# Altium PCB FMM-v1.0.PcbDoc (part 5 of 5)
Units mm, origin at the board's own origin, x right, y up, seen from the top; angles counter-clockwise.
Board outline 115 x 96 mm, 4 copper layers (Top Layer, Power Layer, Ground Layer, Bottom Layer), stack 1.57 mm thick; 218 components, 129 nets, 744 pads, 321 vias.
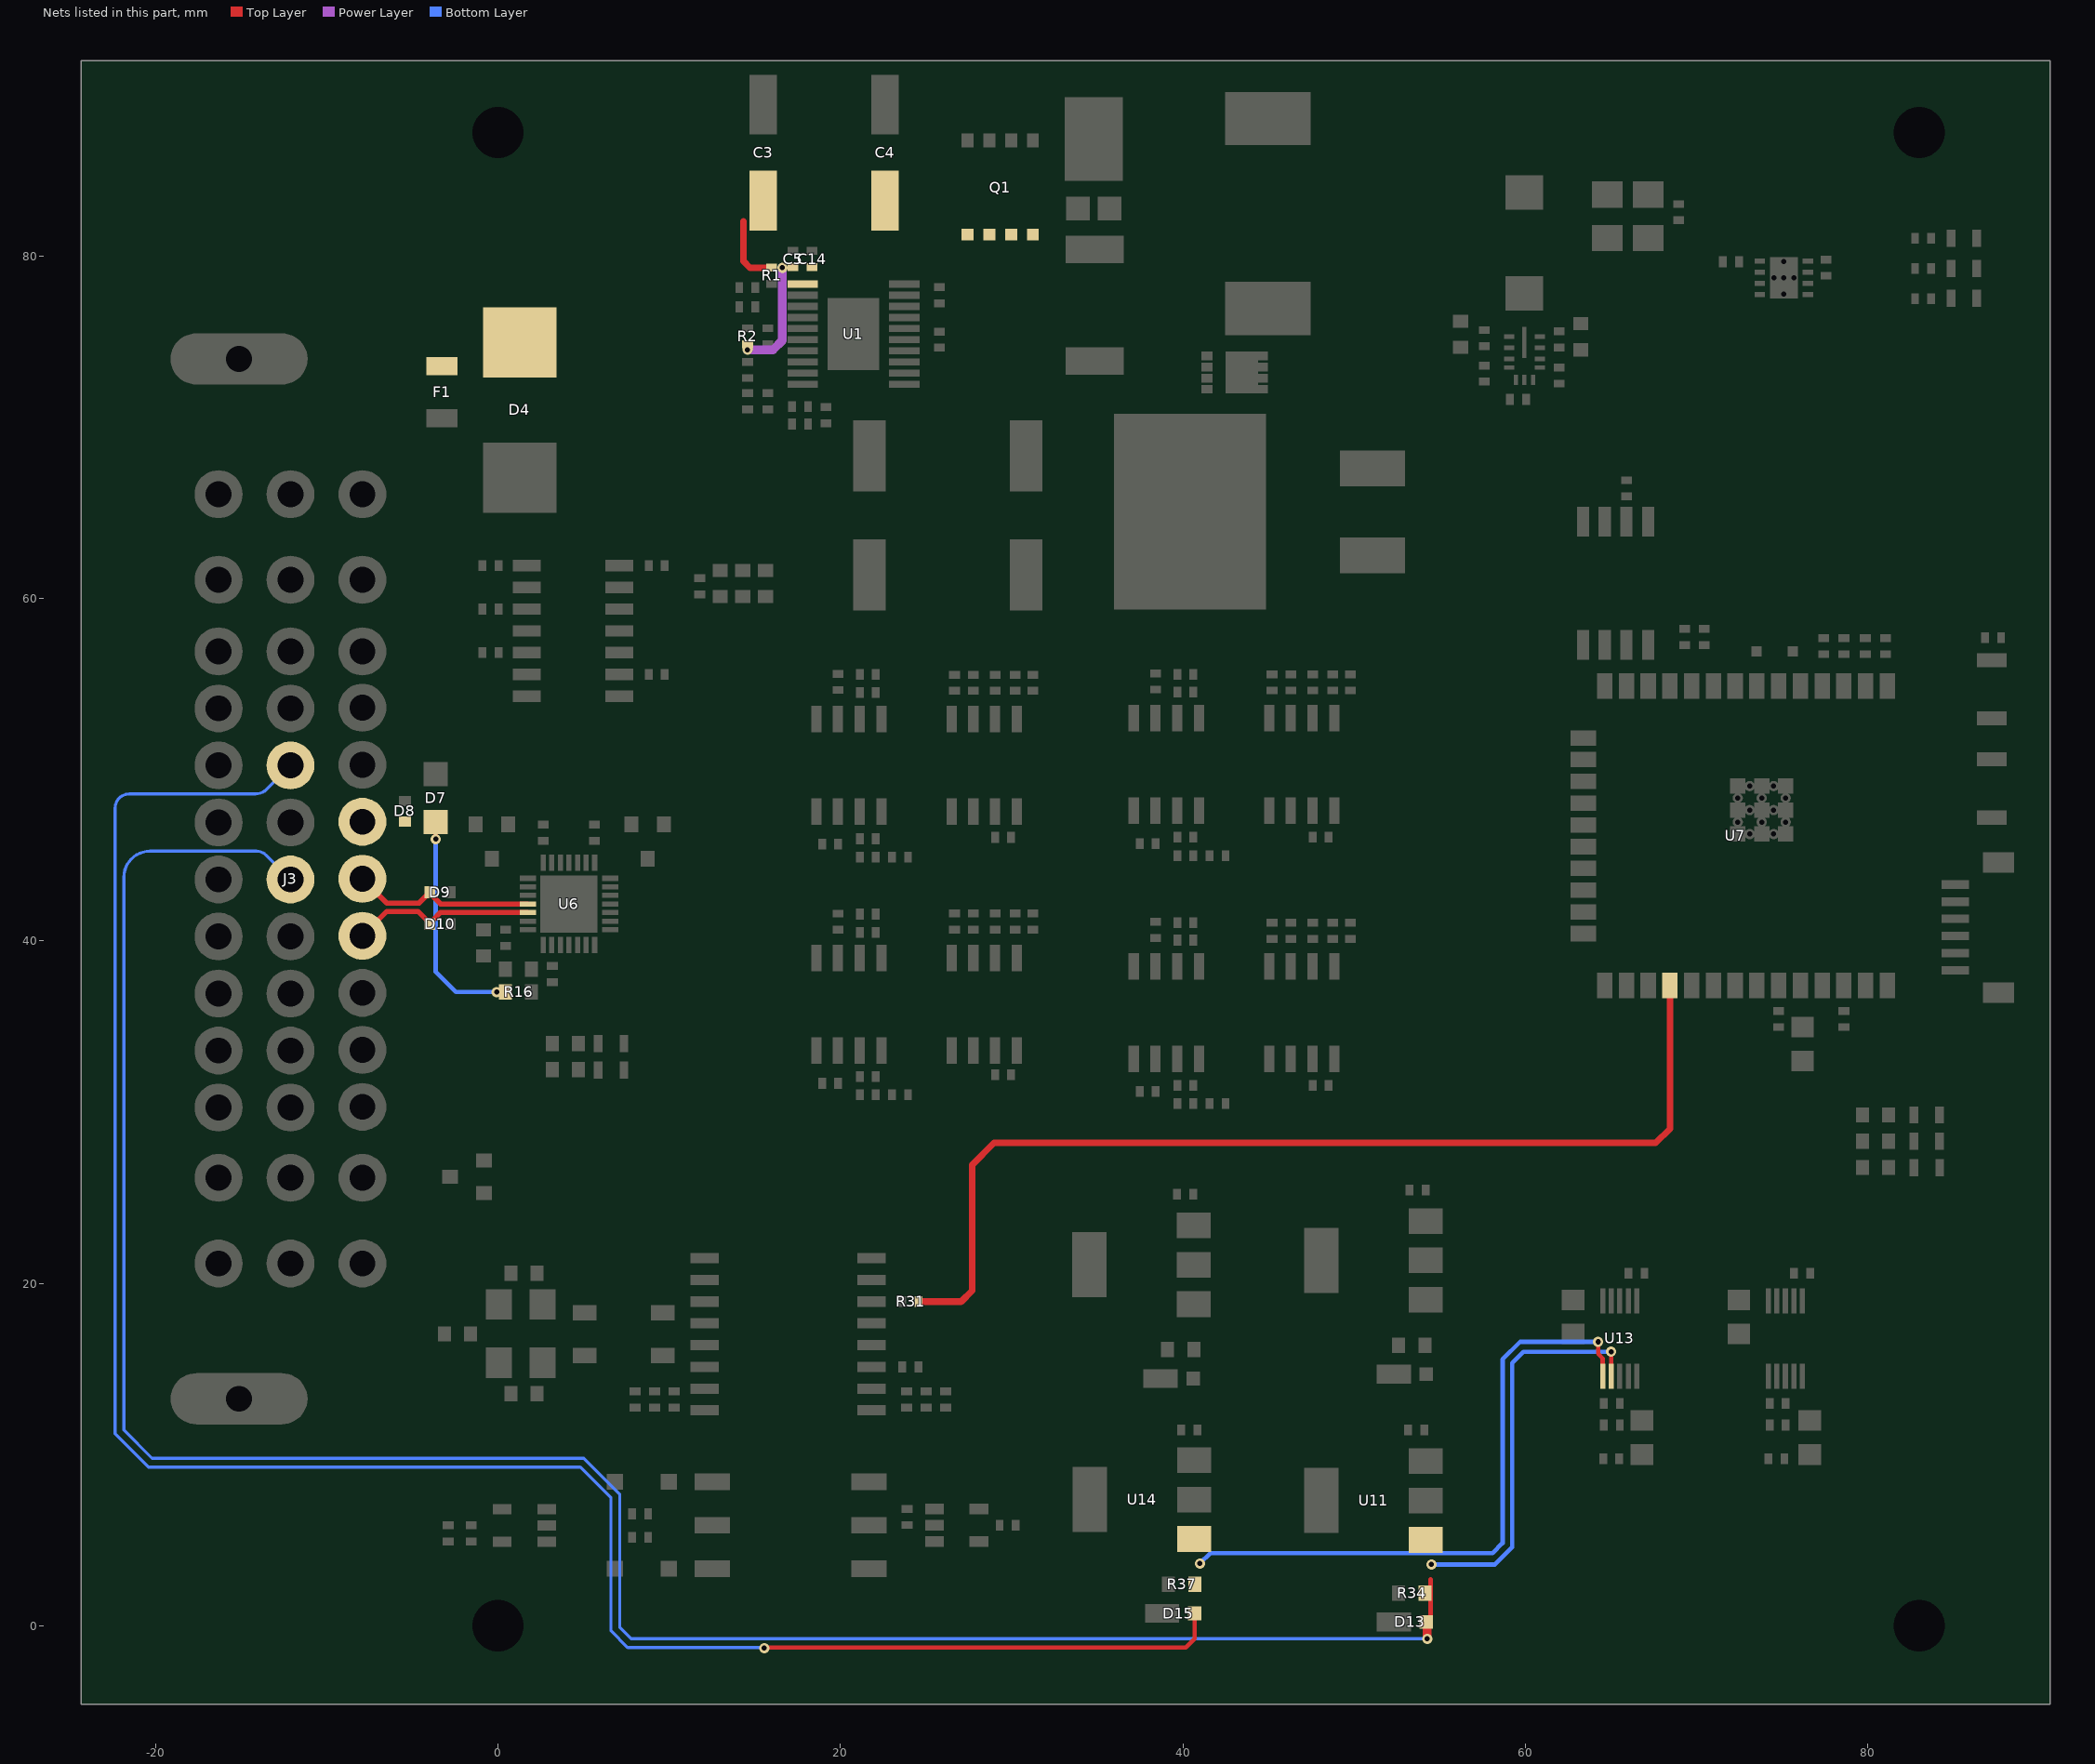
[diagram p5: the nets of this part, all layers, seen from the top]

## Via types
v1: diameter 0.6, hole 0.3, Top Layer to Bottom Layer, 297 vias
v2: diameter 0.6, hole 0.3, Top Layer to Bottom Layer, tented both sides, 24 vias

## Nets (pads, with @x,y where several pads share a name; then routed paths per layer and width w, separated by ;. In a path a pad name is that pad's centre, name@x,y a point inside that pad or via, vN(x,y) a via of type N, cw(c..) or ccw(c..) an arc to the next point about the centre after c; other vN are vias at no path point) (continued)
TNK-SENS-3: D15.2 J3.18 R37.2 U13.6 U14.1 | length 159.4
  Top Layer w0.254: v1(15.549,-1.303) 15.574,-1.278 40.171,-1.278 40.689,-0.76 D15.2@40.689,0.723 ; v1(64.248,16.581) 64.248,15.892 64.515,15.626 U13.6@64.515,14.576
  Bottom Layer w0.178: J3.18@-12.114,50.241 -13.514,48.841 cw(c-14.155,49.483) -14.155,48.576 -21.531,48.576 ccw(c-21.531,47.755) -21.844,48.514 ccw(c-21.531,47.755) -22.29,48.068 ccw(c-21.531,47.755) -22.352,47.755 -22.352,41.241 -22.352,11.215 -20.408,9.271 4.812,9.271 6.604,7.479 6.604,-0.298 7.576,-1.27 15.515,-1.27 v1(15.549,-1.303)
  Bottom Layer w0.254: v1(40.996,3.632) 41.608,4.244 58.092,4.244 58.674,4.826 58.674,15.559 59.696,16.581 v1(64.248,16.581)
TNK-SENS-4: D13.2 J3.20 R34.2 U11.1 U13.7 | length 156.2
  Top Layer w0.254: D13.2@54.216,0.217 D13.2@54.356,0.077 ; D13.2@54.463,0.217 54.463,2.716 ; U13.7@65.015,14.576 v1(65.015,16.002)
  Top Layer w0.508: v1(54.266,-0.762) 54.266,0.071 54.272,0.077 D13.2@54.356,0.077
  Bottom Layer w0.178: J3.20@-12.114,43.581 -13.537,45.005 ccw(c-14.093,44.449) -14.093,45.235 -20.315,45.235 ccw(c-20.315,43.706) -20.937,45.103 ccw(c-20.315,43.706) -21.712,44.328 ccw(c-20.315,43.706) -21.844,43.706 -21.844,40.62 -21.844,11.425 -20.198,9.779 5.022,9.779 7.112,7.689 7.112,-0.088 7.786,-0.762 v1(54.266,-0.762)
  Bottom Layer w0.254: v1(54.515,3.579) 58.221,3.579 59.227,4.585 59.227,15.339 59.89,16.002 v1(65.015,16.002)
TXD2: R31.1 U7.28 | length 60.7
  Top Layer w0.381: R31.1@24.559,18.93 27.058,18.93 27.686,19.558 27.686,26.912 28.968,28.194 67.61,28.194 68.443,29.027 U7.28@68.443,37.388
USB_D_N: D10.2 J3.8 U6.5 | length 10.8
  Top Layer w0.305: J3.8@-7.914,40.292 -6.49,41.715 -4.675,41.715 -4.135,41.175 -4.124,41.175 D10.2@-3.976,41.027 ; D10.2@-3.976,40.977 D10.2@-3.976,41.027 ; U6.5@1.741,41.66 -3.352,41.66 -3.828,41.184 -3.828,41.175 D10.2@-3.976,41.027
USB_D_P: D9.2 J3.7 U6.4 | length 10.9
  Top Layer w0.305: J3.7@-7.914,43.622 -6.49,42.198 -4.605,42.198 -4.169,42.633 -4.124,42.633 -3.976,42.781 D9.2@-3.976,42.831 -3.828,42.683 -3.828,42.625 -3.346,42.143 U6.4@1.741,42.143
VBUS: D7.1 D8.2 J3.6 R16.1 | length 12.8
  Top Layer w0.254: v1(-3.632,45.943) D7.1@-3.632,46.931
  Bottom Layer w0.254: v1(-3.632,45.943) -3.632,38.176 -2.464,37.008 v1(-0.069,37.008)
VIN: C3.1 C4.1 C5.2 C14.2 D4.1 F1.2 Q1.5 Q1.6 Q1.7 Q1.8 R1.2 R2.2 U1.1 | length 10.7
  Top Layer w0.127: C5.2@17.199,79.311 C5.2@17.231,79.344
  Top Layer w0.381: 14.339,82.013 14.339,79.692 14.719,79.311 R1.2@15.977,79.311
  Power Layer w0.508: v1(14.577,74.513) 16.063,74.513 16.613,75.064 v1(16.613,79.311)
pads on no net: J3.5 J3.10 J3.22 J3.35 J3.MH U1.11 U5.4 U6.1 U6.2 U6.10 U6.11 U6.12 U6.13 U6.14 U6.15 U6.16 U6.17 U6.20 U6.21 U6.22 U6.23 U6.27 U7.4 U7.5 U7.6 U7.15 U7.17 U7.18 U7.19 U7.20 U7.21 U7.22 U7.24 U7.29 U7.32 U8.1 U8.7 U9.4 U9.5 U9.11 U9.14 U15.10 U15.12 U16.1 U16.5 U16.8 U17.1 U17.5 U17.8 U19.1 U19.5 U19.8 U20.1 U20.5 U20.8 U21.1 U21.5 U21.8 U22.1 U22.5 U22.8 U23.1 U23.5 U23.8 U24.1 U24.5 U24.8

## Polygon pours and split planes (outlines as drawn)
GND on Top Layer "GND_L01_P033" (solid, pour order 33): -24.346,91.706 90.654,91.706 90.654,-4.294 -24.346,-4.294 -24.346,91.706
VIN on Top Layer "VIN_L01_P024" (solid, pour order 24): -9.314,72.893 -9.314,79.985 -0.635,79.985 4.886,85.505 31.615,85.505 31.615,81.48 7.845,81.48 3.42,77.055 3.42,72.866
NetC15_2 on Top Layer "NETC15_2_L01_P007" (solid, pour order 7): 59.741,73.851 60.154,73.851 60.154,75.777 61.037,76.66 61.037,79.042 58.837,79.042 58.837,76.677 59.741,75.773
GND on Ground Layer "GND_L03_P032" (solid, pour order 32): -24.346,91.404 90.654,91.404 90.654,-4.596 -24.346,-4.596 -24.346,91.404
ISO-GND on Ground Layer "ISO-GND_L03_P026" (solid, pour order 26): -9.906,22.346 -9.276,22.977 14.803,22.977 15.442,22.338 15.442,1.98 14.732,1.27 -9.271,1.27 -9.906,1.905 -9.906,15.748
5V on Power Layer "5V_L02_P029" (solid, pour order 29): 18.821,-4.596 18.821,29.82 17.818,30.823 -1.105,30.823 -2.159,31.877 -2.159,63.627 -2.159,63.844 -14.914,63.844 -14.914,80.463 -13.081,82.296 75.875,82.296 75.875,76.708 78.74,76.708 78.74,78.382 83.312,78.382 83.312,80.242 78.74,80.242 78.74,91.404 -24.346,91.404 -24.346,-4.596
12V on Power Layer "12V_L02_P028" (solid, pour order 28): -14.914,64.238 9.271,64.238 9.271,59.923 51.953,59.923 53.151,58.725 53.151,27.436 52.207,26.492 40.107,26.492 39.637,26.023 39.637,9.817 40.208,9.246 61.824,9.246 62.562,9.984 62.562,59.923 62.562,67.515 65.776,70.729 65.776,82.296 -14.914,82.296
3V3 on Power Layer "3V3_L02_P030" (solid, pour order 30): 17.818,30.823 18.854,29.787 18.821,27.305 18.821,-4.596 90.654,-4.596 90.654,91.404 53.703,91.404 53.703,62.289 51.337,59.923 18.571,59.923 18.533,59.884 18.495,59.923 10.668,59.923 10.668,64.516 -2.159,64.516 -2.159,31.877 -1.105,30.823
12V on Power Layer "12V_L02_P031" (solid, pour order 31): 40.107,26.492 39.637,26.023 39.637,9.817 40.208,9.246 56.21,9.246 56.693,9.728 56.693,25.933 56.134,26.492
5V-ISO on Power Layer "5V-ISO_L02_P027" (solid, pour order 27): -3.538,5.86 1.524,5.86 2.032,6.368 2.032,12.88 2.36,13.208 13.422,13.208 13.716,12.914 13.716,4.572 13.462,4.318 -3.599,4.318 -3.81,4.529 -3.81,5.588
GND on Bottom Layer "GND_L04_P025" (solid, pour order 25): -24.346,91.404 90.654,91.404 90.654,-4.596 -24.346,-4.596 -24.346,91.404

## Keep-outs
Keep-Out Layer:
  rectangle: 15.95,1.98 17.83,22.592

## Other copper
Top Layer:
  rectangle net GND: 71.283,45.339 76.2,49.911
  rectangle net VIN: 27.053,80.891 31.615,82.296
  rectangle net 3V3: 65.605,66.891 66.205,67.489
  rectangle net IO0: 86.945,46.482 87.544,47.195
  rectangle net GND: 71.953,45.784 75.653,49.484
  rectangle net GND: 1.274,42.501 2.799,42.801
  region net 3V3: 7.087,60.34 7.087,60.94 6.02,60.94 6.02,60.34
  rectangle net NetR16_2: 1.588,36.563 2.35,38.778
  rectangle net 3V3: 77.118,57.449 77.717,58.061
  region net 3V3: 81.036,56.966 81.036,56.509 81.648,56.509 81.648,56.966
  region net GND: 75.609,57.202 75.609,56.603 76.221,56.603 76.221,57.202
  region net GND: 87.629,37.282 87.629,36.683 88.879,36.683 88.879,37.282
  region net GND: 87.629,44.882 87.629,44.283 88.879,44.283 88.879,44.882
  region net GND: 87.243,50.895 87.243,50.295 88.493,50.295 88.493,50.895
  region net GND: 87.243,53.281 87.243,52.681 88.493,52.681 88.493,53.281
  region net GND: 86.379,57.997 86.379,57.397 86.876,57.397 86.876,57.997
  rectangle net EN: 87.556,55.971 88.103,58.015
  rectangle net GND: 78.285,57.448 81.353,58.598
  rectangle net 3V3: 79.533,54.888 80.168,56.966
  rectangle net 3V3: 79.533,56.509 81.353,56.966
  rectangle net EN: 78.285,54.888 78.92,56.966
  rectangle net EN: 77.1,56.509 78.92,56.966
  rectangle net ADC: 73.209,54.888 73.809,57.203
  rectangle net NetFB1_2: 74.475,34.37 78.929,35.192
  region net 3V3: 76.184,33.27 76.184,32.67 76.952,32.67 76.952,33.27
  region net IO23: 79.697,27.997 79.697,28.597 78.929,28.597 78.929,27.997
  region net IO4: 79.697,29.534 79.697,30.133 78.929,30.133 78.929,29.534
  rectangle net GND: 83.939,26.26 85.192,30.333
  rectangle net NetLED8_1: 80.84,26.315 82.689,27.204
  rectangle net NetLED6_1: 80.84,27.852 82.689,28.741
  rectangle net NetLED7_1: 80.84,29.389 82.689,30.278
  rectangle net EN: 86.972,55.702 87.577,56.381
  region net NetC79_1: 37.473,30.908 37.473,31.508 36.97,31.508 36.97,30.908
  rectangle net NetC79_2: 38.185,30.875 38.642,33.1
  region net NetC62_1: 18.932,31.383 18.932,31.982 18.429,31.982 18.429,31.383
  rectangle net NetC62_2: 19.643,31.366 20.1,33.592
  rectangle net TEMP-3: 40.384,39.725 40.841,41.426
  rectangle net TEMP-1: 21.842,40.179 22.299,41.88
  rectangle net 3V3: 38.102,38.5 38.702,40.169
  rectangle net GND: 38.085,40.869 39.116,41.338
  rectangle net GND: 39.116,40.805 39.901,41.411
  rectangle net NetC79_2: 39.444,38.5 39.901,40.037
  rectangle net NetC79_2: 39.444,39.72 39.901,40.355
  rectangle net NetC79_1: 40.384,30.174 41.781,30.809
  rectangle net NetC77_2: 39.444,30.174 39.901,33.1
  rectangle net 3V3: 47.277,33.553 47.877,34.151
  rectangle net 3V3: 47.348,31.584 47.806,33.1
  rectangle net NetC80_2: 47.277,38.5 47.877,40.144
  rectangle net NetC78_2: 46.067,38.5 46.527,40.355
  rectangle net TEMP-SNS-3: 48.428,39.89 50.106,40.372
  rectangle net NetC78_2: 44.892,39.89 46.624,40.372
  region net TEMP-SNS-3: 50.088,40.144 49.488,40.144 49.488,39.641 50.088,39.641
  rectangle net NetC64_2: 28.735,38.992 29.335,40.635
  rectangle net NetC61_2: 27.525,38.992 27.985,40.846
  rectangle net TEMP-SNS-1: 29.886,40.406 31.564,40.882
  rectangle net NetC61_2: 26.35,40.406 28.082,40.882
  region net TEMP-SNS-1: 31.546,40.635 30.946,40.635 30.946,40.132 31.546,40.132
  rectangle net NetC62_2: 20.902,40.211 21.359,40.846
  rectangle net NetC62_2: 20.902,38.992 21.359,40.529
  rectangle net GND: 20.574,41.296 21.359,41.903
  rectangle net GND: 19.543,41.36 20.574,41.83
  rectangle net 3V3: 19.56,38.992 20.16,40.757
  rectangle net TEMP-3: 49.488,41.033 50.088,41.536
  rectangle net GND: 44.91,41.033 45.509,41.536
  rectangle net NetC80_1: 45.989,40.804 49.063,41.376
  rectangle net NetC64_1: 27.447,41.309 30.521,41.88
  rectangle net GND: 26.368,41.538 26.967,42.04
  rectangle net TEMP-1: 30.946,41.538 31.546,42.04
  rectangle net GND: 38.085,55.384 39.116,55.841
  rectangle net NetC86_2: 39.444,54.223 39.901,54.858
  rectangle net NetC86_2: 39.444,53.004 39.901,54.541
  rectangle net GND: 39.116,55.308 39.901,55.915
  rectangle net 3V3: 38.102,53.004 38.702,54.673
  rectangle net NetC86_2: 38.185,45.378 38.642,47.604
  rectangle net GND: 40.643,48.057 41.242,48.655
  rectangle net NetC84_2: 39.444,44.627 39.901,47.604
  rectangle net NetC87_2: 47.337,53.004 47.797,54.858
  rectangle net NetC85_2: 46.067,53.004 46.527,54.858
  rectangle net TEMP-SNS-4: 48.428,54.419 50.106,54.876
  rectangle net NetC85_2: 44.892,54.393 46.624,54.876
  rectangle net NetC87_1: 45.989,55.333 49.063,55.79
  rectangle net GND: 44.91,55.587 45.509,56.09
  rectangle net TEMP-4: 49.488,55.587 50.088,56.09
  region net TEMP-SNS-4: 50.088,54.647 49.488,54.647 49.488,54.144 50.088,54.144
  rectangle net 3V3: 47.348,46.087 47.806,47.604
  region net GND: 48.288,46.366 48.288,45.767 49.011,45.767 49.011,46.366
  rectangle net 3V3: 47.277,46.829 47.877,48.655
  region net NetC86_1: 40.612,45.27 40.612,44.67 41.552,44.67 41.552,45.27
  region net GND: 40.612,46.362 40.612,45.762 41.115,45.762 41.115,46.362
  region net NetC86_1: 37.473,45.375 37.473,45.974 36.97,45.974 36.97,45.375
  region net NetC72_1: 18.932,45.345 18.932,45.945 18.429,45.945 18.429,45.345
  rectangle net NetC72_2: 19.643,45.327 20.1,47.553
  region net TEMP-SNS-2: 31.546,54.596 30.946,54.596 30.946,54.094 31.546,54.094
  rectangle net TEMP-2: 30.946,55.536 31.546,56.039
  rectangle net GND: 26.368,55.536 26.967,56.039
  region net GND: 26.795,52.953 26.195,52.953 26.195,51.98 26.795,51.98
  rectangle net NetC74_1: 27.447,55.308 30.521,55.765
  rectangle net NetC71_2: 26.35,54.368 28.082,54.825
  rectangle net IO33: 65.791,20.662 66.248,21.43
  rectangle net NetC66_2: 72.157,19.034 72.76,19.787
  rectangle net NetC66_1: 76.4,20.268 77.487,20.903
  rectangle net NetC66_1: 76.699,11.398 77.487,20.903
  rectangle net NetC66_1: 74.96,11.404 75.417,13.309
  region net GND: 72.39,16.734 72.39,17.334 71.622,17.334 71.622,16.734
  rectangle net NetC66_1: 75.034,12.991 75.334,14.576
  region net GND: 74.417,9.447 74.417,10.046 73.649,10.046 73.649,9.447
  rectangle net 3V3: 74.9,9.398 77.106,10.064
  rectangle net NetC66_1: 74.96,11.398 77.131,12.598
  rectangle net NetC52_2: 62.487,19.034 63.091,19.787
  region net GND: 62.713,16.734 62.713,17.334 61.945,17.334 61.945,16.734
  rectangle net NetC52_1: 66.365,17.434 67.213,19.701
  rectangle net NetC52_1: 67.029,11.398 67.818,20.903
  rectangle net NetC52_1: 66.515,17.434 67.818,20.903
  rectangle net NetC52_1: 65.291,11.404 65.748,13.309
  rectangle net TNK-SENS-4: 53.748,-0.333 55.178,5.765
  rectangle net NetC52_1: 65.291,11.398 67.462,12.598
  region net GND: 64.773,9.447 64.773,10.046 64.005,10.046 64.005,9.447
  rectangle net 3V3: 65.256,9.398 67.462,10.064
  rectangle net NetC52_1: 65.365,12.991 65.665,14.576
  rectangle net ISO-GND: 8.544,4.846 13.551,6.85
  rectangle net 3V3: 19.56,52.953 20.16,54.718
  rectangle net 3V3: 28.735,48.006 29.335,48.604
  rectangle net 3V3: 28.735,34.036 29.335,34.634
  rectangle net 3V3: 28.806,31.867 29.264,33.592
  rectangle net NetC62_1: 21.842,30.692 23.239,31.327
  rectangle net NetC60_2: 20.902,31.009 21.359,33.592
  region net GND: 22.07,32.376 22.07,31.776 22.668,31.776 22.668,32.376
  rectangle net GND: 22.101,34.036 22.7,34.634
  rectangle net GND: 40.643,33.528 41.242,34.126
  region net GND: 48.517,31.858 48.517,31.259 49.114,31.259 49.114,31.858
  region net GND: 40.612,31.858 40.612,31.259 41.21,31.259 41.21,31.858
  region net GND: 26.795,38.608 26.195,38.608 26.195,38.01 26.795,38.01
  region net GND: 45.337,38.1 44.737,38.1 44.737,37.502 45.337,37.502
  region net GND: 45.337,52.578 44.737,52.578 44.737,51.98 45.337,51.98
  region net GND: 29.975,46.336 29.975,45.737 30.572,45.737 30.572,46.336
  rectangle net 3V3: 28.806,46.037 29.264,47.553
  rectangle net TEMP-SNS-2: 29.886,54.368 31.564,54.825
  rectangle net NetC71_2: 27.525,52.953 27.985,54.807
  rectangle net NetC74_2: 28.735,52.953 29.335,54.596
  region net GND: 22.07,46.26 22.07,45.661 22.668,45.661 22.668,46.26
  rectangle net NetC72_1: 21.842,44.576 23.239,45.211
  rectangle net NetC70_2: 20.902,44.576 21.359,47.553
  rectangle net GND: 22.101,48.006 22.7,48.604
  rectangle net GND: 19.543,55.359 20.574,55.816
  rectangle net GND: 20.574,55.257 21.359,55.864
  rectangle net NetC72_2: 20.902,52.953 21.359,54.49
  rectangle net NetC72_2: 20.902,54.172 21.359,54.807
  rectangle net 3V3: 72.253,78.075 73.072,79.676
  region net GND: 77.861,78.838 77.261,78.838 77.261,78.292 77.861,78.292
  rectangle net 5V: 76.2,79.532 77.878,79.854
  rectangle net 5V: 77.266,79.696 77.866,80.243
  rectangle net GND: 76.2,78.384 77.878,79.067
  rectangle net 3V3: 72.253,79.377 73.072,79.976
  rectangle net 3V3: 73.072,79.532 74,79.842
  rectangle net 3V3: 73.072,78.232 74,78.542
  region net GND: 86.36,81.321 86.36,80.721 86.906,80.721 86.906,81.321
  region net GND: 86.36,79.568 86.36,78.969 86.906,78.969 86.906,79.568
  region net GND: 86.36,77.816 86.36,77.216 86.906,77.216 86.906,77.816
  region net 3V3: 82.757,77.204 82.757,77.803 82.211,77.803 82.211,77.204
  region net 5V: 82.757,78.969 82.757,79.568 82.211,79.568 82.211,78.969
  region net 12V: 82.757,80.721 82.757,81.321 82.211,81.321 82.211,80.721
  rectangle net NetLED3_1: 83.468,77.186 84.86,77.821
  rectangle net NetLED2_1: 83.468,78.951 84.86,79.586
  rectangle net NetLED1_1: 83.468,80.703 84.86,81.338
  rectangle net GND: 73.4,78.882 74.525,79.192
  region net GND: 74,77.892 73.4,77.892 73.4,77.346 74,77.346
  region net GND: 71.539,79.356 71.539,79.955 71.222,79.955 71.222,79.356
  region net 5V: 76.8,77.737 76.2,77.737 76.2,77.346 76.8,77.346
  rectangle net GND: 55.784,75.435 57.918,76.566
  region net GND: 60.044,71.918 60.044,71.318 60.497,71.318 60.497,71.918
  rectangle net 5V: 58.837,82.707 69.278,84.811
  region net 5V: 60.445,73.055 60.445,72.456 60.866,72.456 60.866,73.055
  region net 12V: 56.083,74.351 56.083,74.95 55.537,74.95 55.537,74.351
  region net 12V: 63.373,74.798 63.373,74.198 63.919,74.198 63.919,74.798
  rectangle net 12V: 60.545,74.127 63.684,74.889
  rectangle net NetR12_2: 60.545,73.251 62.287,73.606
  rectangle net 12V: 60.545,73.856 61.145,74.631
  rectangle net 12V: 60.545,74.419 63.684,74.889
  rectangle net GND: 60.545,75.156 62.287,75.588
  rectangle net GND: 61.67,75.588 62.269,76.134
  rectangle net GND: 62.94,76.032 63.539,76.578
  region net GND: 65.085,81.036 64.485,81.036 64.485,80.099 65.085,80.099
  region net GND: 67.483,81.036 66.883,81.036 66.883,80.099 67.483,80.099
  region net GND: 69.261,82.08 68.661,82.08 68.661,81.534 69.261,81.534
  rectangle net NetQ1_4: 27.132,86.741 27.732,87.509
  rectangle net 12V: 55.784,74.28 57.918,75.042
  rectangle net ADC: 11.468,59.728 13.424,60.474
  rectangle net 12V: 12.535,61.236 20.94,63.692
  rectangle net GND: 11.486,61.176 12.085,61.609
  region net ADC: 13.279,60.093 12.68,60.093 12.68,59.495 13.279,59.495
  region net GND: 15.924,60.093 15.325,60.093 15.325,59.495 15.924,59.495
  region net GND: 14.6,60.096 14,60.096 14,59.499 14.6,59.499
  rectangle net NetC13_1: 14.26,69.863 17.399,71.514
  rectangle net 12V: 15.432,71.755 18.685,72.712
  rectangle net NetD2_1: 33.144,79.563 36.544,83.462
  region net NetQ2_4: 41.619,72.208 41.19,72.208 41.19,71.369 41.619,71.369
  rectangle net NetC2_1: 28.352,86.331 36.498,89.574
  rectangle net NetC2_1: 22.541,78.183 23.735,78.522
  rectangle net GND: 14.262,71.755 14.907,73.121
  rectangle net VIN: 15.659,79.083 18.685,79.54
  region net VIN: 14.879,74.978 14.275,74.978 14.275,74.504 14.879,74.504
  region net GND: 14.241,76.724 14.241,77.323 13.728,77.323 13.728,76.724
  region net GND: 14.241,77.841 14.241,78.44 13.728,78.44 13.728,77.841
  region net GND: 30.158,6.168 30.158,5.568 30.672,5.568 30.672,6.168
  rectangle net 12V: 53.862,8.919 55.178,11.801
  rectangle net 12V: 40.368,22.633 41.637,25.515
  rectangle net 12V: 40.39,8.919 41.659,11.801
  rectangle net 12V: 53.917,22.887 55.186,25.769
  rectangle net TNK-SENS-2: 40.201,13.887 41.637,19.533
  rectangle net TNK-SENS-1: 53.748,14.141 55.186,19.787
  rectangle net TNK-SENS-3: 40.289,0.173 41.659,5.819
  rectangle net NetR35_1: 34.268,20.333 41.368,21.833
  rectangle net NetR33_1: 48.086,20.587 55.186,22.087
  rectangle net NetR34_1: 48.031,6.113 55.178,7.613
  rectangle net NetR37_1: 34.559,6.619 41.659,8.119
  region net GND: 39.657,24.898 39.657,25.497 38.889,25.497 38.889,24.898
  region net GND: 53.238,25.152 53.238,25.751 52.47,25.751 52.47,25.152
  region net GND: 53.151,11.133 53.151,11.733 52.383,11.733 52.383,11.133
  region net GND: 39.911,11.133 39.911,11.733 39.143,11.733 39.143,11.133
  region net GND: 52.316,14.379 52.316,14.979 51.087,14.979 51.087,14.379
  region net GND: 38.701,14.125 38.701,14.725 37.473,14.725 37.473,14.125
  region net GND: 52.351,-0.094 52.351,0.505 51.123,0.505 51.123,-0.094
  region net GND: 38.789,0.412 38.789,1.011 37.561,1.011 37.561,0.412
  region net 3V3: 29.527,5.57 29.527,6.17 28.759,6.17 28.759,5.57
  rectangle net GND: 23.602,6.604 24.201,7.372
  region net 3V3: 29.299,5.57 29.299,6.17 21.661,6.17 21.661,5.57
  region net GND: 28.094,6.52 28.094,7.12 27.326,7.12 27.326,6.52
  region net GND: 28.094,4.62 28.094,5.22 27.326,5.22 27.326,4.62
  rectangle net NetC30_2: 2.301,2.88 8.061,5.21
  rectangle net NetC30_2: 2.301,6.51 8.061,8.86
  rectangle net ISO-GND: -1.852,5.636 -1.253,6.404
  rectangle net ISO-GND: -3.207,5.636 -2.607,6.404
  region net ISO-GND: 2.851,5.56 2.851,6.16 2.083,6.16 2.083,5.56
  rectangle net NetC30_2: 4.191,2.88 8.061,8.86
  region net ISO-GND: -3.124,16.744 -3.124,17.343 -3.892,17.343 -3.892,16.744
  rectangle net NetC41_1: -1.981,14.474 0.826,19.652
  region net ISO-GND: 0.765,13.245 0.765,13.845 -0.003,13.845 -0.003,13.245
  region net ISO-GND: 0.765,20.287 0.765,20.887 -0.003,20.887 -0.003,20.287
  rectangle net CAN_P: 1.842,13.095 5.771,16.303
  rectangle net CAN_N: 1.842,17.823 5.771,21.031
  region net ISO-GND: 12.077,19.9 12.077,20.5 10.89,20.5 10.89,19.9
  region net ISO-GND: 12.077,21.17 12.077,21.77 10.89,21.77 10.89,21.17
  region net GND: 21.827,21.769 21.827,21.17 23.013,21.17 23.013,21.769
  region net GND: 21.827,20.499 21.827,19.9 23.013,19.9 23.013,20.499
  region net TXD2: 24.412,19.231 24.412,18.631 24.926,18.631 24.926,19.231
  rectangle net NetR31_2: 21.827,18.63 23.619,19.23
  rectangle net NetR30_2: 21.827,14.82 23.619,15.42
  region net GND: 26.591,14.15 21.002,14.15 21.002,13.456 26.591,13.456
  region net 3V3: 26.591,12.973 21.002,12.973 21.002,12.28 26.591,12.28
  rectangle net ISO-GND: 7.693,13.456 12.902,14.15
  rectangle net SDA: 74.475,35.674 75.11,37.388
  rectangle net SCL: 78.285,35.674 78.92,37.388
  region net 3V3: 84.836,43.032 84.836,43.532 83.96,43.532 83.96,43.032
  region net GND: 84.836,42.032 84.836,42.532 83.96,42.532 83.96,42.032
  region net RXD: 84.836,41.032 84.836,41.532 83.96,41.532 83.96,41.032
  region net RXD0: 84.836,40.032 84.836,40.532 83.96,40.532 83.96,40.032
  region net IO0: 84.836,39.032 84.836,39.532 83.96,39.532 83.96,39.032
  region net EN: 84.836,38.032 84.836,38.532 83.96,38.532 83.96,38.032
  rectangle net SCL: 78.303,37.388 78.903,38.264
  rectangle net GND: 80.843,37.388 81.443,38.264
  rectangle net IO23: 79.573,37.388 80.173,38.264
  rectangle net RXD: 77.033,37.388 77.633,38.264
  rectangle net SDA: 74.493,37.388 75.093,38.264
  rectangle net FLOW-RDN-4: 70.683,37.388 71.283,38.264
  rectangle net RXD2: 66.873,37.388 67.473,38.264
  rectangle net IO4: 65.603,37.388 66.203,38.264
  rectangle net IO0: 64.333,37.388 64.933,38.264
  region net GND: 81.443,54.888 80.843,54.888 80.843,54.012 81.443,54.012
  region net 3V3: 80.173,54.888 79.573,54.888 79.573,54.012 80.173,54.012
  region net EN: 78.903,54.888 78.303,54.888 78.303,54.012 78.903,54.012
  region net ADC: 73.823,54.888 73.223,54.888 73.223,54.012 73.823,54.012
  region net IO32: 72.553,54.888 71.953,54.888 71.953,54.012 72.553,54.012
  region net IO33: 71.283,54.888 70.683,54.888 70.683,54.012 71.283,54.012
  region net FLOW-RDN-1: 70.013,54.888 69.413,54.888 69.413,54.012 70.013,54.012
  region net FLOW-RDN-2: 68.743,54.888 68.143,54.888 68.143,54.012 68.743,54.012
  region net FLOW-RDN-3: 67.473,54.888 66.873,54.888 66.873,54.012 67.473,54.012
  region net SCLK: 66.203,54.888 65.603,54.888 65.603,54.012 66.203,54.012
  rectangle net GND: 70.149,58.185 70.749,58.782
  rectangle net GND: 69.006,58.185 69.606,58.782
  region net 3V3: 69.606,57.27 69.006,57.27 69.006,56.672 69.606,56.672
  region net 3V3: 70.749,57.27 70.149,57.27 70.149,56.672 70.749,56.672
  rectangle net 3V3: 66.819,56.291 70.766,57.499
  rectangle net CS: 65.587,64.478 66.222,66.18
  region net GND: 9.747,62.209 9.747,61.61 10.345,61.61 10.345,62.209
  region net 3V3: 9.747,55.859 9.747,55.26 10.345,55.26 10.345,55.859
  region net 3V3: -0.908,61.61 -0.908,62.21 -1.506,62.21 -1.506,61.61
  region net 3V3: -0.908,59.07 -0.908,59.67 -1.506,59.67 -1.506,59.07
  region net 3V3: -0.908,56.53 -0.908,57.13 -1.506,57.13 -1.506,56.53
  region net 3V3: 7.087,62.209 7.087,61.61 8.807,61.61 8.807,62.209
  region net FLOW-SNS-4: 7.087,55.26 7.087,55.86 6.02,55.86 6.02,55.26
  region net 3V3: 7.087,57.8 7.087,58.4 6.02,58.4 6.02,57.8
  region net FLOW-SNS-1: 1.687,62.209 1.687,61.61 2.755,61.61 2.755,62.209
  region net FLOW-SNS-2: 1.687,59.669 1.687,59.07 2.755,59.07 2.755,59.669
  region net FLOW-SNS-3: 1.687,57.129 1.687,56.53 2.755,56.53 2.755,57.129
  region net FLOW-SNS-4: 7.087,55.859 7.087,55.26 8.155,55.26 8.155,55.859
  region net FLOW-RDN-1: 1.687,60.939 1.687,60.34 2.755,60.34 2.755,60.939
  region net FLOW-RDN-2: 1.687,58.399 1.687,57.8 2.755,57.8 2.755,58.399
  region net FLOW-RDN-3: 1.687,55.859 1.687,55.26 2.755,55.26 2.755,55.859
  region net GND: 1.687,54.589 1.687,53.99 2.755,53.99 2.755,54.589
  region net FLOW-RDN-4: 7.087,53.99 7.087,54.59 6.02,54.59 6.02,53.99
  rectangle net FLOW-SNS-4: 6.859,55.242 9.277,55.877
  rectangle net FLOW-SNS-3: -0.197,56.512 1.687,57.147
  rectangle net FLOW-SNS-2: -0.197,59.052 1.687,59.687
  rectangle net FLOW-SNS-1: -0.197,61.592 1.687,62.227
  rectangle net 3V3: -1.283,40.259 2.224,41.301
  rectangle net NetLED4_1: 4.323,32.029 5.854,32.918
  rectangle net NetLED5_1: 4.323,33.553 5.854,34.442
  rectangle net 3V3: 2.875,34.087 3.475,34.779
  rectangle net 3V3: 2.799,32.143 3.561,34.34
  rectangle net GND: 0.132,38.333 0.767,39.712
  region net 3V3: 3.475,37.736 2.876,37.736 2.876,37.222 3.475,37.222
  region net DTR: 8.087,46.711 7.488,46.711 7.488,46.197 8.087,46.197
  region net IO0: 9.037,44.704 8.438,44.704 8.438,44.19 9.037,44.19
  region net RTS: 5.938,45.999 5.339,45.999 5.339,45.485 5.938,45.485
  region net DTR: 2.949,45.999 2.35,45.999 2.35,45.485 2.949,45.485
  rectangle net RTS: -1.595,46.914 -0.996,47.428
  region net EN: -0.056,44.577 -0.655,44.577 -0.655,44.063 -0.056,44.063
  rectangle net 5V: -3.932,50.19 -3.332,50.704
  rectangle net GND: -5.735,48.163 -5.136,48.677
  region net VBUS: -3.333,46.457 -3.932,46.457 -3.932,45.943 -3.333,45.943
  rectangle net VBUS: -7.914,46.663 -3.632,47.263
  rectangle net NetQ3_1: 0.594,46.558 2.967,47.02
  rectangle net DTR: 2.499,44.551 2.799,45.847
  region net GND: -2.776,43.131 -2.776,42.531 -2.262,42.531 -2.262,43.131
  region net GND: -2.776,41.277 -2.776,40.677 -2.262,40.677 -2.262,41.277
  region net VBUS: 0.445,36.708 0.445,37.308 -0.069,37.308 -0.069,36.708
  region net GND: -0.539,39.116 -1.138,39.116 -1.138,38.602 -0.539,38.602
  rectangle net 3V3: -0.838,40.423 0.767,40.88
  rectangle net NetR15_2: 2.999,38.651 3.299,39.751
  rectangle net 5V-ISO: 7.693,12.28 12.902,12.973
  rectangle net 5V-ISO: -3.224,4.607 0.251,5.21
  rectangle net NetD5_1: 9.504,2.88 12.521,3.78
  rectangle net NetD6_1: 9.504,7.96 12.521,8.86
  rectangle net NetR1_1: 14.806,77.527 16.294,78.6
  rectangle net VIN: 16.905,78.142 18.685,79.572
  rectangle net GND: 16.931,80.283 17.531,80.797
  rectangle net GND: 18.049,80.283 18.649,80.797
  rectangle net NetC12_2: 17.882,69.863 19.469,70.498
  rectangle net NetC12_1: 17.882,70.879 19.469,71.514
  rectangle net GND: 41.077,72.858 41.727,74.408
  rectangle net 12V: 16.772,59.334 44.855,63.692
  rectangle net NetD1_1: 42.458,71.958 52.985,78.474
  rectangle net NetD1_1: 48.057,59.334 52.985,78.474
  rectangle net NetC2_1: 33.098,84.376 52.985,89.574
  rectangle net DC_IN: -9.314,64.993 -2.361,71.036
  region net GND: 19.014,75.276 17.729,75.276 17.729,74.938 19.014,74.938
  rectangle net GND: 22.541,74.279 23.825,74.618
  region net NetD2_1: 25.019,73.321 23.912,73.321 23.912,72.982 25.019,72.982
  region net GND: 19.723,75.312 17.795,75.312 17.795,74.892 19.723,74.892
  rectangle net GND: 21.806,74.242 23.735,74.662
  rectangle net GND: 21.806,76.192 24.625,76.612
  region net NetC1_2: 26.098,75.921 23.735,75.921 23.735,75.582 26.098,75.582
  region net NetQ2_4: 25.019,75.271 23.735,75.271 23.735,74.932 25.019,74.932
  rectangle net GND: 25.463,74.282 26.098,74.719
  region net GND: 26.098,74.621 23.735,74.621 23.735,74.282 26.098,74.282
  region net NetQ1_4: 25.019,77.871 23.735,77.871 23.735,77.532 25.019,77.532
  region net NetC2_2: 26.098,77.221 23.735,77.221 23.735,76.882 26.098,76.882
  region net NetC2_1: 26.098,78.521 23.735,78.521 23.735,78.182 26.098,78.182
  rectangle net NetR1_1: 14.806,77.527 17.795,77.886
  rectangle net DC_IN: -9.314,59.677 -2.361,71.036
  rectangle net VIN: -9.314,72.893 3.42,77.648
  pour cut-out: 20.149,30.136 20.31,30.297 20.31,30.974 20.158,31.127 19.661,31.127 19.543,31.009 16.983,31.009 16.983,42.328 20.132,42.328 20.234,42.43 20.234,42.933 20.127,43.039 16.449,43.039 ccw(c16.449,42.811) 16.221,42.811 16.221,30.492 ccw(c16.449,30.492) 16.449,30.263 19.548,30.263 19.675,30.136
  pour cut-out: 20.149,44.098 20.31,44.259 20.31,44.936 20.158,45.088 19.661,45.088 19.543,44.971 16.983,44.971 16.983,56.29 20.132,56.29 20.234,56.391 20.234,56.894 20.127,57.001 16.449,57.001 ccw(c16.449,56.772) 16.221,56.772 16.221,44.453 ccw(c16.449,44.453) 16.449,44.225 19.548,44.225 19.675,44.098
  pour cut-out: 38.691,29.645 38.852,29.806 38.852,30.483 38.7,30.636 38.203,30.636 38.085,30.518 35.525,30.518 35.525,41.837 38.674,41.837 38.776,41.939 38.776,42.442 38.669,42.548 34.991,42.548 ccw(c34.991,42.32) 34.763,42.32 34.763,30.001 ccw(c34.991,30.001) 34.991,29.772 38.09,29.772 38.217,29.645
  pour cut-out: 38.691,44.148 38.852,44.309 38.852,44.987 38.7,45.139 38.203,45.139 38.085,45.022 35.525,45.022 35.525,56.34 38.674,56.34 38.776,56.442 38.776,56.945 38.669,57.052 34.991,57.052 ccw(c34.991,56.823) 34.763,56.823 34.763,44.504 ccw(c34.991,44.504) 34.991,44.275 38.09,44.275 38.217,44.148
  pour cut-out: 53.376,59.288 -6.223,59.288 -6.223,33.972 -9.144,31.051 -9.144,1.067 18.288,1.067 18.288,27.94 53.376,27.94
  pour cut-out: 32.324,29.73 32.07,29.984 32.07,30.492 32.197,30.619 32.197,42.506 32.349,42.658 32.731,42.658 32.908,42.481 32.908,30.619 33.035,30.492 33.035,29.958 32.807,29.73
  pour cut-out: 32.324,44.072 32.07,44.326 32.07,44.834 32.197,44.961 32.197,56.848 32.349,57 32.731,57 32.908,56.823 32.908,44.961 33.035,44.834 33.035,44.301 32.807,44.072
  pour cut-out: 50.866,29.62 50.612,29.874 50.612,30.382 50.739,30.509 50.739,42.396 50.891,42.548 51.273,42.548 51.45,42.37 51.45,30.509 51.577,30.382 51.577,29.848 51.349,29.62
  pour cut-out: 50.866,44.123 50.612,44.377 50.612,44.885 50.739,45.012 50.739,56.899 50.891,57.051 51.273,57.051 51.45,56.874 51.45,45.012 51.577,44.885 51.577,44.352 51.349,44.123

## Silkscreen, mask and mechanical layers (free items; w line width, h text height)
Top Overlay:
  lines w0.127: 64.516,73.914 65.722,73.914 ; 7.297,69.374 11.056,69.374 11.056,72.172 7.297,72.172 7.297,69.374 ; 16.516,69.527 19.812,69.527 19.812,71.882 16.516,71.882 16.516,69.527 ; 55.245,70.866 64.516,70.866 64.516,76.962 55.245,76.962 55.245,70.866 ; 65.786,70.967 72.644,70.967 72.644,76.381 65.786,76.381 65.786,70.967
  text "12V" at 87.505,80.388 h1.52
  text "5V" at 87.505,78.635 h1.52
  text "3V3" at 87.505,76.883 h1.52
  text "FUSE~1A" at -2.361,74.511 h1.52 r90
  text "#" at 11.379,71.215 h0.76
  text "#" at 20.091,70.939 h0.76
  text "ENABLE" at 90.132,51.881 h1.52 r90
  text "BOOT" at 90.132,46.914 h1.52 r90
  text "VOLTLINK" at 90.124,37.198 h1.52 r90
  text "RX" at 8.641,33.368 h1.52
  text "TX" at 8.641,31.844 h1.52
  text "FAULT" at 85.454,29.201 h1.52
  text "POWER" at 85.454,27.651 h1.4
  text "NMEA" at 85.454,26.128 h1.52
Bottom Overlay:
  text "Rev-v1.0" at 77.562,2.429 h2
Top Solder:
  lines w0.508: 19.86,30.612 16.597,30.612 16.597,42.681 19.86,42.681 ; 19.86,44.597 16.596,44.597 16.596,56.667 19.86,56.667 ; 32.556,30.152 32.556,42.221 ; 32.556,44.493 32.556,56.562 ; 38.402,30.145 35.139,30.145 35.139,42.214 38.402,42.214 ; 38.402,44.652 35.139,44.652 35.139,56.722 38.402,56.722 ; 51.098,30.167 51.098,42.237 ; 51.098,44.548 51.098,56.618
Dimensions:
  drawing of 295 lines, arcs and shapes, not listed
  text "Layer" at -21.571,147.066 h1.52
  text "Name" at -11.159,147.066 h1.52
  text "Material" at 12.456,147.066 h1.52
  text "Thickness" at 34.294,147.066 h1.52
  text "Constant" at 50.8,147.066 h1.52
  text "Board Layer Stack" at 65.274,147.066 h1.52
  text "Top Overlay" at -11.159,144.018 h1.52
  text "Top Solder" at -11.159,140.97 h1.52
  text "Solder Resist" at 12.456,140.97 h1.52
  text "0.010mm" at 34.294,140.97 h1.52
  text "3.5" at 50.8,140.97 h1.52
  text "1" at -21.571,137.922 h1.52
  text "Top Layer" at -11.159,137.922 h1.52
  text "0.035mm" at 34.294,137.922 h1.52
  text "Dielectric 2" at -11.159,134.874 h1.52
  text "PP-006" at 12.456,134.874 h1.52
  text "0.200mm" at 34.294,134.874 h1.52
  text "4.1" at 50.8,134.874 h1.52
  text "2" at -21.571,131.826 h1.52
  text "Power Layer" at -11.159,131.826 h1.52
  text "CF-004" at 12.456,131.826 h1.52
  text "0.035mm" at 34.294,131.826 h1.52
  text "Dielectric 1" at -11.159,128.778 h1.52
  text "FR-4" at 12.456,128.778 h1.52
  text "1.030mm" at 34.294,128.778 h1.52
  text "4.8" at 50.8,128.778 h1.52
  text "3" at -21.571,125.73 h1.52
  text "Ground Layer" at -11.159,125.73 h1.52
  text "CF-004" at 12.456,125.73 h1.52
  text "0.035mm" at 34.294,125.73 h1.52
  text "Dielectric 3" at -11.159,122.682 h1.52
  text "PP-006" at 12.456,122.682 h1.52
  text "0.200mm" at 34.294,122.682 h1.52
  text "4.1" at 50.8,122.682 h1.52
  text "4" at -21.571,119.634 h1.52
  text "Bottom Layer" at -11.159,119.634 h1.52
  text "0.035mm" at 34.294,119.634 h1.52
  text "Bottom Solder" at -11.159,116.586 h1.52
  text "Solder Resist" at 12.456,116.586 h1.52
  text "0.010mm" at 34.294,116.586 h1.52
  text "3.5" at 50.8,116.586 h1.52
  text "Bottom Overlay" at -11.159,113.538 h1.52
  text "Total board thickness:" at -21.571,110.49 h1.52
  text "1.590mm" at 34.294,110.49 h1.52
Board Outline:
  the board outline again, w0.127
Fabrication:
  circle w0.006: c-20.55,105.003 r0.003
  circle w0.006: c-444.333,-158.245 r0.003
  circle w0.006: c-421.7,-158.245 r0.003
  circle w0.006: c-421.7,-48.246 r0.003
  circle w0.006: c-4.32,105.319 r0.003
  circle w0.006: c87.403,55.979 r0.003
  circle w0.006: c83.487,2.005 r0.003
  circle w0.006: c-202.034,-48.244 r0.003
  circle w0.006: c-65.215,-50.478 r0.003
Drill Drawing:
  circle w0.254: c104.283,131.249 r0.847
  lines w0.254: 103.436,119.819 104.283,118.972 105.13,119.819 104.283,120.665 103.436,119.819 ; 103.436,123.205 103.86,123.205 104.283,122.782 104.706,123.205 105.13,123.205 104.706,123.629 105.13,124.052 104.706,124.052 104.283,124.475 103.86,124.052 103.436,124.052 103.86,123.629 103.436,123.205 ; 103.436,127.015 103.86,127.015 104.283,126.592 104.706,127.015 105.13,127.015 104.706,127.439 105.13,127.862 104.706,127.862 104.283,128.285 103.86,127.862 103.436,127.862 103.86,127.439 103.436,127.015 ; 103.436,135.905 105.13,135.905 104.283,134.212 103.436,135.905 ; 103.775,123.375 104.029,123.375 104.283,123.121 104.537,123.375 104.791,123.375 104.537,123.629 104.791,123.883 104.537,123.883 104.283,124.137 104.029,123.883 103.775,123.883 104.029,123.629 103.775,123.375
  lines w0.381: 101.917,117.829 374.231,117.829 ; 101.917,136.879 374.231,136.879 ; 115.91,114.019 115.91,140.689 ; 131.146,114.019 131.146,140.689 ; 159.585,114.019 159.585,140.689 ; 172.435,114.019 172.435,140.689 ; 191.073,114.019 191.073,140.689 ; 229.162,114.019 229.162,140.689 ; 244.144,114.019 244.144,140.689 ; 263.087,114.019 263.087,140.689 ; 283.655,114.019 283.655,140.689 ; 305.341,114.019 305.341,140.689 ; 339.215,114.019 339.215,140.689 ; 101.917,114.019 374.231,114.019 374.231,140.689 101.917,140.689 101.917,114.019
  text "Symbol" at 104.203,138.022 h1.83
  text "Count" at 117.053,138.022 h1.83
  text "Hole Size" at 132.289,138.022 h1.83
  text "Plated" at 160.728,138.022 h1.83
  text "Hole Type" at 173.578,138.022 h1.83
  text "Drill Layer Pair" at 192.216,138.022 h1.83
  text "Via/Pad" at 230.305,138.022 h1.83
  text "Pad Shape" at 245.287,138.022 h1.83
  text "Template" at 264.23,138.022 h1.83
  text "Description" at 284.798,138.022 h1.83
  text "Hole Tolerance (+)" at 306.484,138.022 h1.83
  text "Hole Tolerance (-)" at 340.358,138.022 h1.83
  text "2" at 117.053,134.212 h1.52
  text "59.45mil (1.510mm)" at 132.289,134.212 h1.52
  text "PTH" at 160.728,134.212 h1.52
  text "Slot" at 173.578,134.212 h1.52
  text "Top Layer - Bottom Layer" at 192.216,134.212 h1.52
  text "Pad" at 230.305,134.212 h1.52
  text "Rounded" at 245.287,134.212 h1.52
  text "(Mixed)" at 264.23,134.212 h1.52
  text "4" at 117.053,130.402 h1.52
  text "118.11mil (3.000mm)" at 132.289,130.402 h1.52
  text "NPTH" at 160.728,130.402 h1.52
  text "Round" at 173.578,130.402 h1.52
  text "Top Layer - Bottom Layer" at 192.216,130.402 h1.52
  text "Pad" at 230.305,130.402 h1.52
  text "Rounded" at 245.287,130.402 h1.52
  text "c0hn300" at 264.23,130.402 h1.52
  text "5" at 117.053,126.592 h1.52
  text "7.87mil (0.200mm)" at 132.289,126.592 h1.52
  text "PTH" at 160.728,126.592 h1.52
  text "Round" at 173.578,126.592 h1.52
  text "Top Layer - Bottom Layer" at 192.216,126.592 h1.52
  text "Pad" at 230.305,126.592 h1.52
  text "Rounded" at 245.287,126.592 h1.52
  text "c40h20m40p40" at 264.23,126.592 h1.52
  text "39" at 117.053,122.782 h1.52
  text "59.45mil (1.510mm)" at 132.289,122.782 h1.52
  text "PTH" at 160.728,122.782 h1.52
  text "Round" at 173.578,122.782 h1.52
  text "Top Layer - Bottom Layer" at 192.216,122.782 h1.52
  text "Pad" at 230.305,122.782 h1.52
  text "Rounded" at 245.287,122.782 h1.52
  text "c280h151" at 264.23,122.782 h1.52
  text "312" at 117.053,118.972 h1.52
  text "11.81mil (0.300mm)" at 132.289,118.972 h1.52
  text "PTH" at 160.728,118.972 h1.52
  text "Round" at 173.578,118.972 h1.52
  text "Top Layer - Bottom Layer" at 192.216,118.972 h1.52
  text "(Mixed)" at 230.305,118.972 h1.52
  text "Rounded" at 245.287,118.972 h1.52
  text "(Mixed)" at 264.23,118.972 h1.52
  text "362 Total" at 117.053,115.162 h1.52
  text "Slot definitions :" at 104.203,111.48 h1.52
  text "Routed Path Length" at 130.434,111.48 h1.52
  text "= Calculated from tool start centre position to tool end centre position." at 158.442,111.48 h1.52
  text "Hole Length" at 130.434,108.94 h1.52
  text "= Routed Path Length + Tool Size = Slot length as defined in the PCB layout" at 148.031,108.94 h1.52

## Dimensions
90.654,91.404 to 90.654,-4.596 on Dimensions
-24.346,91.404 to 90.654,91.404 on Dimensions

## Text inside footprints (layer, text, board x,y; h text height)
J3: Top Overlay "PCB Edge" at -23.62,58.866 h1 r270